# Altium PCB PCB1.PcbDoc
Units mm, origin at the board's own origin, x right, y up, seen from the top; angles counter-clockwise.
Board outline 99.95 x 99.95 mm, 4 copper layers (Top Layer, GND, PWR, Bottom Layer), stack 0.603 mm thick; 94 components, 50 nets, 219 pads, 0 vias.
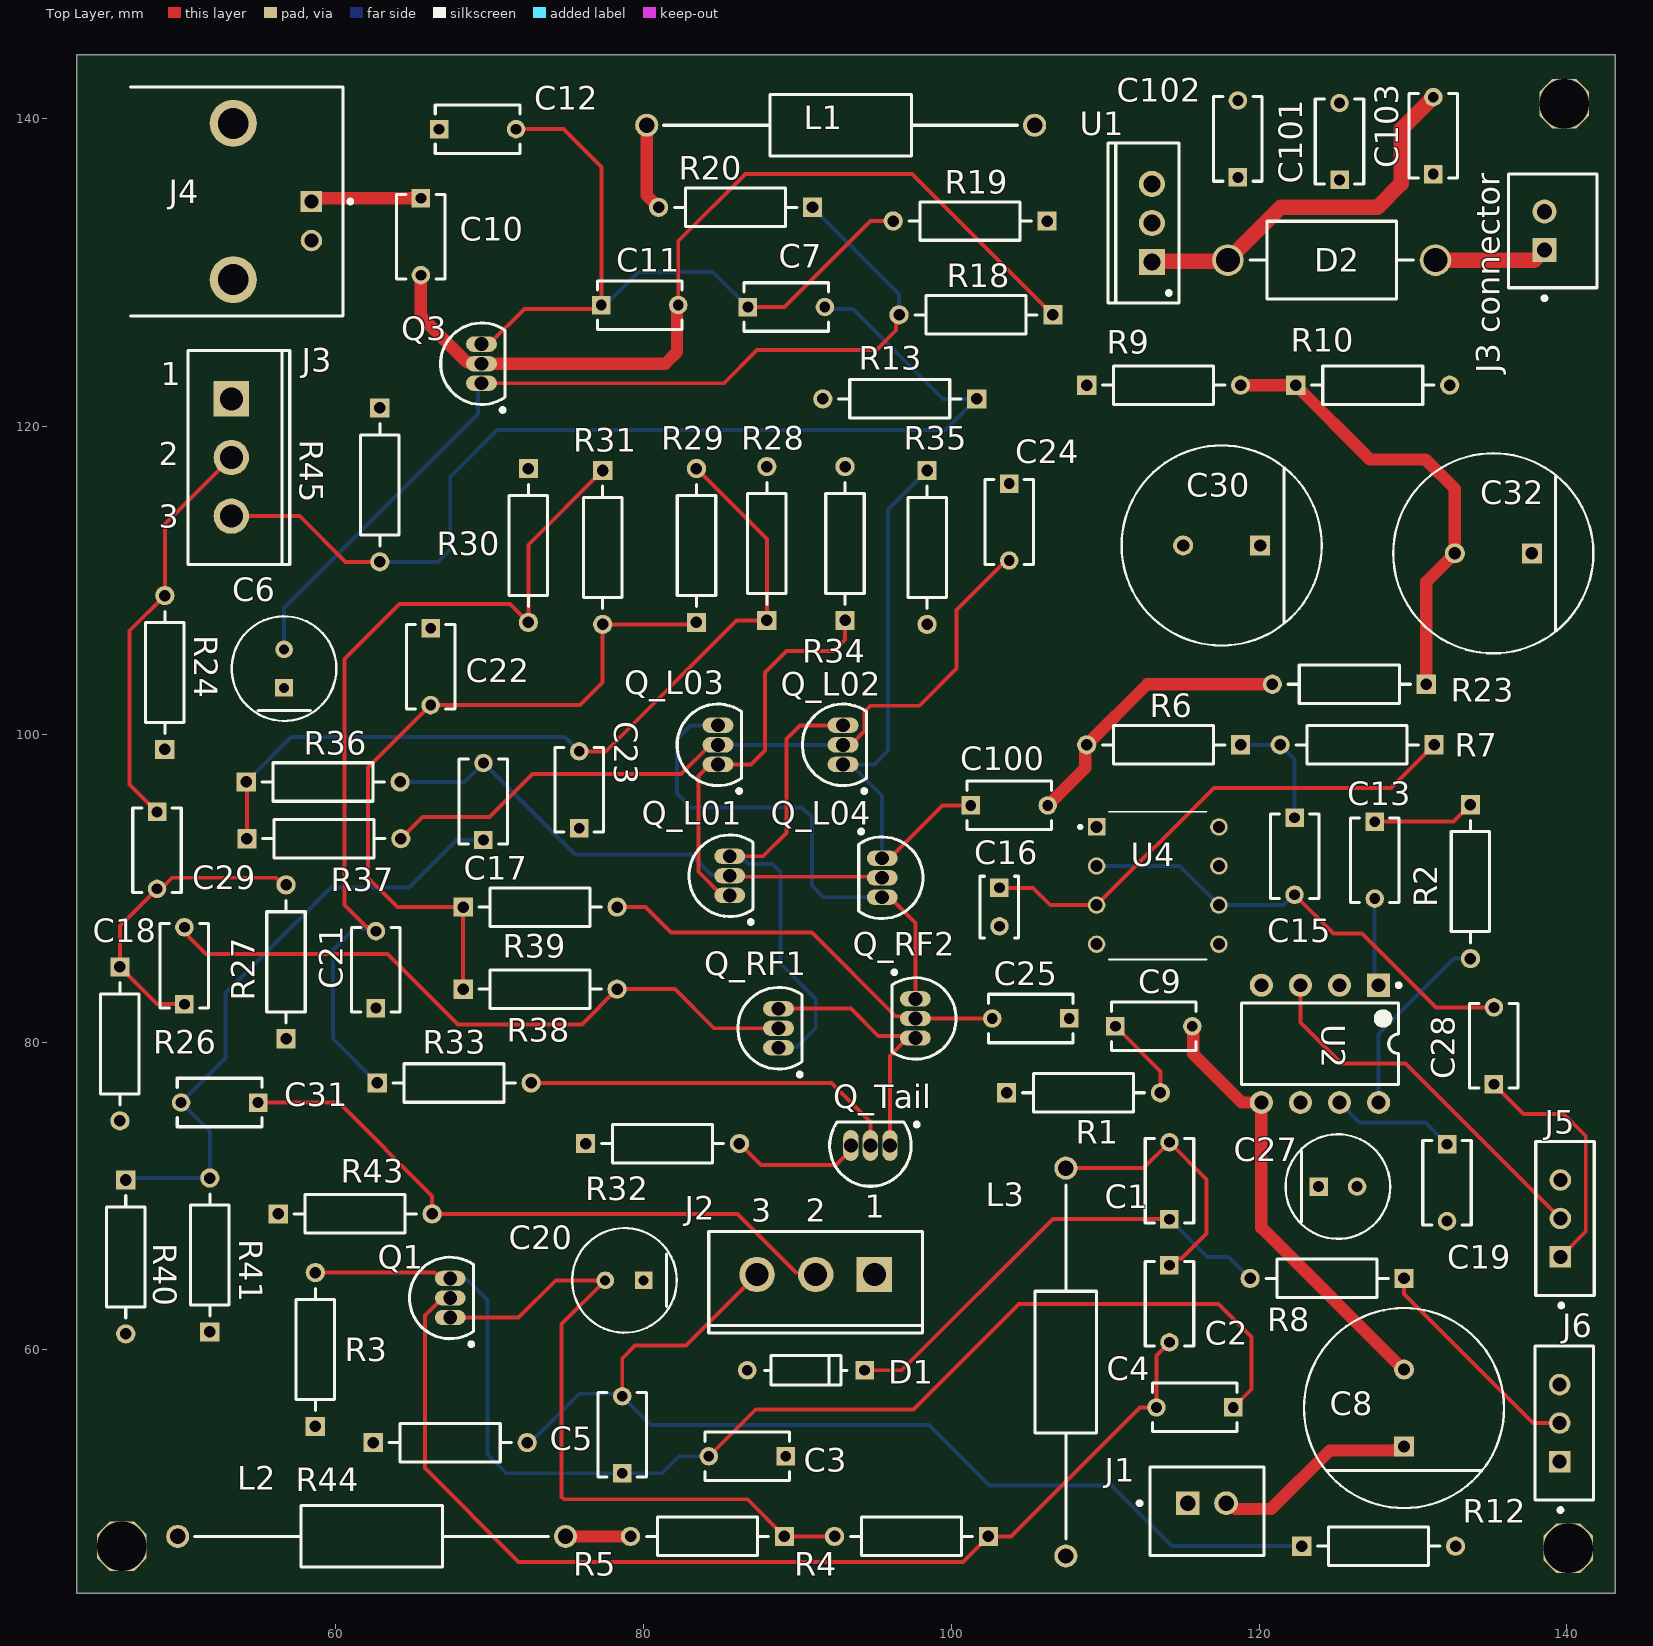
[diagram p0: Top Layer view]
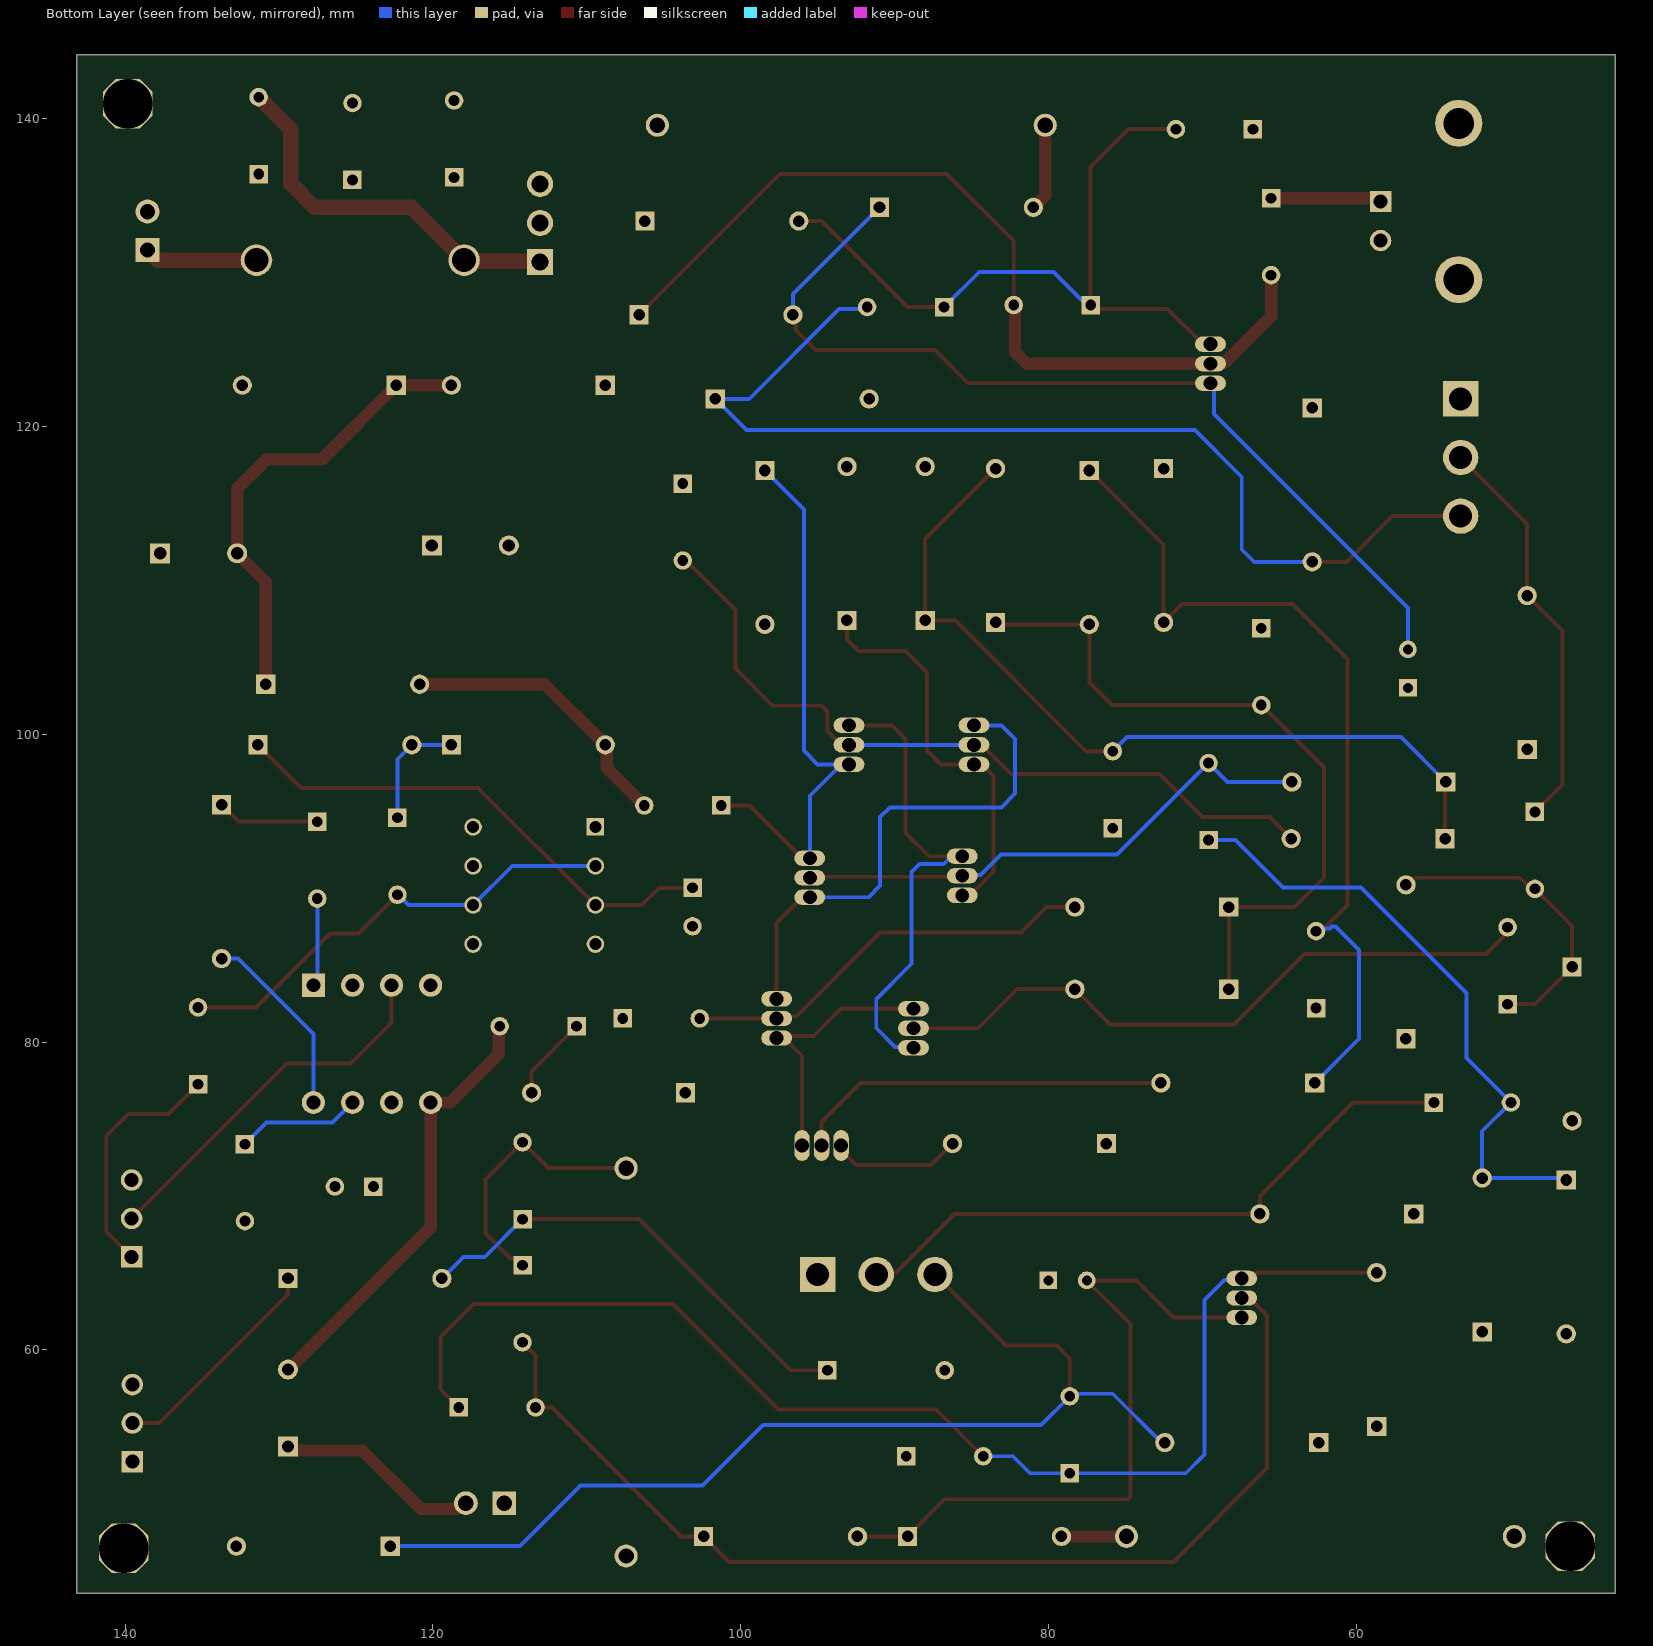
[diagram p1: Bottom Layer view, seen from below]
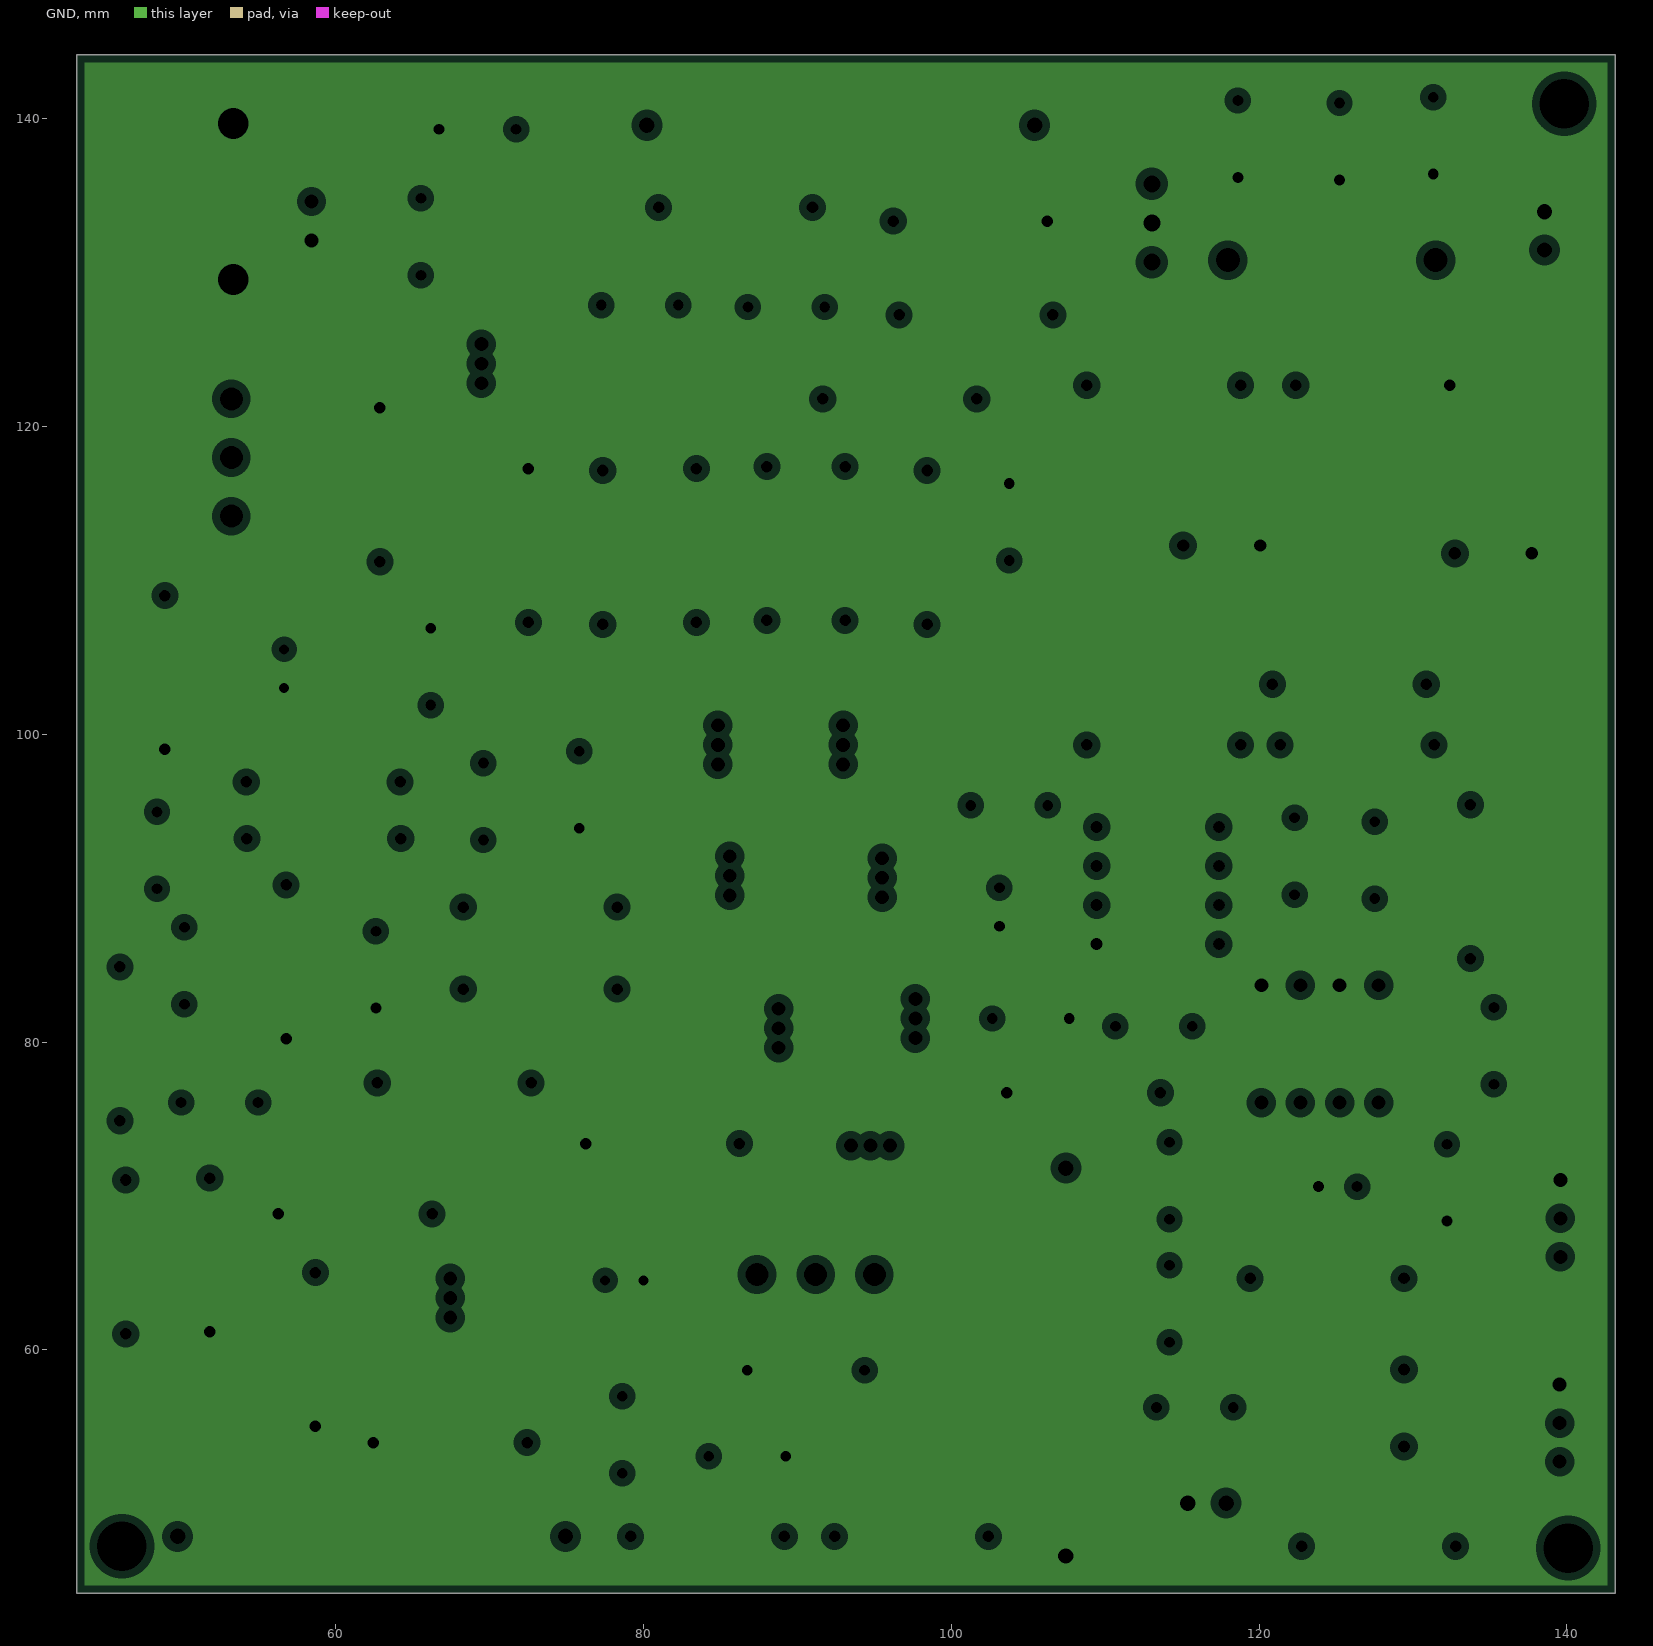
[diagram p2: GND, clearances drawn from the general rule]
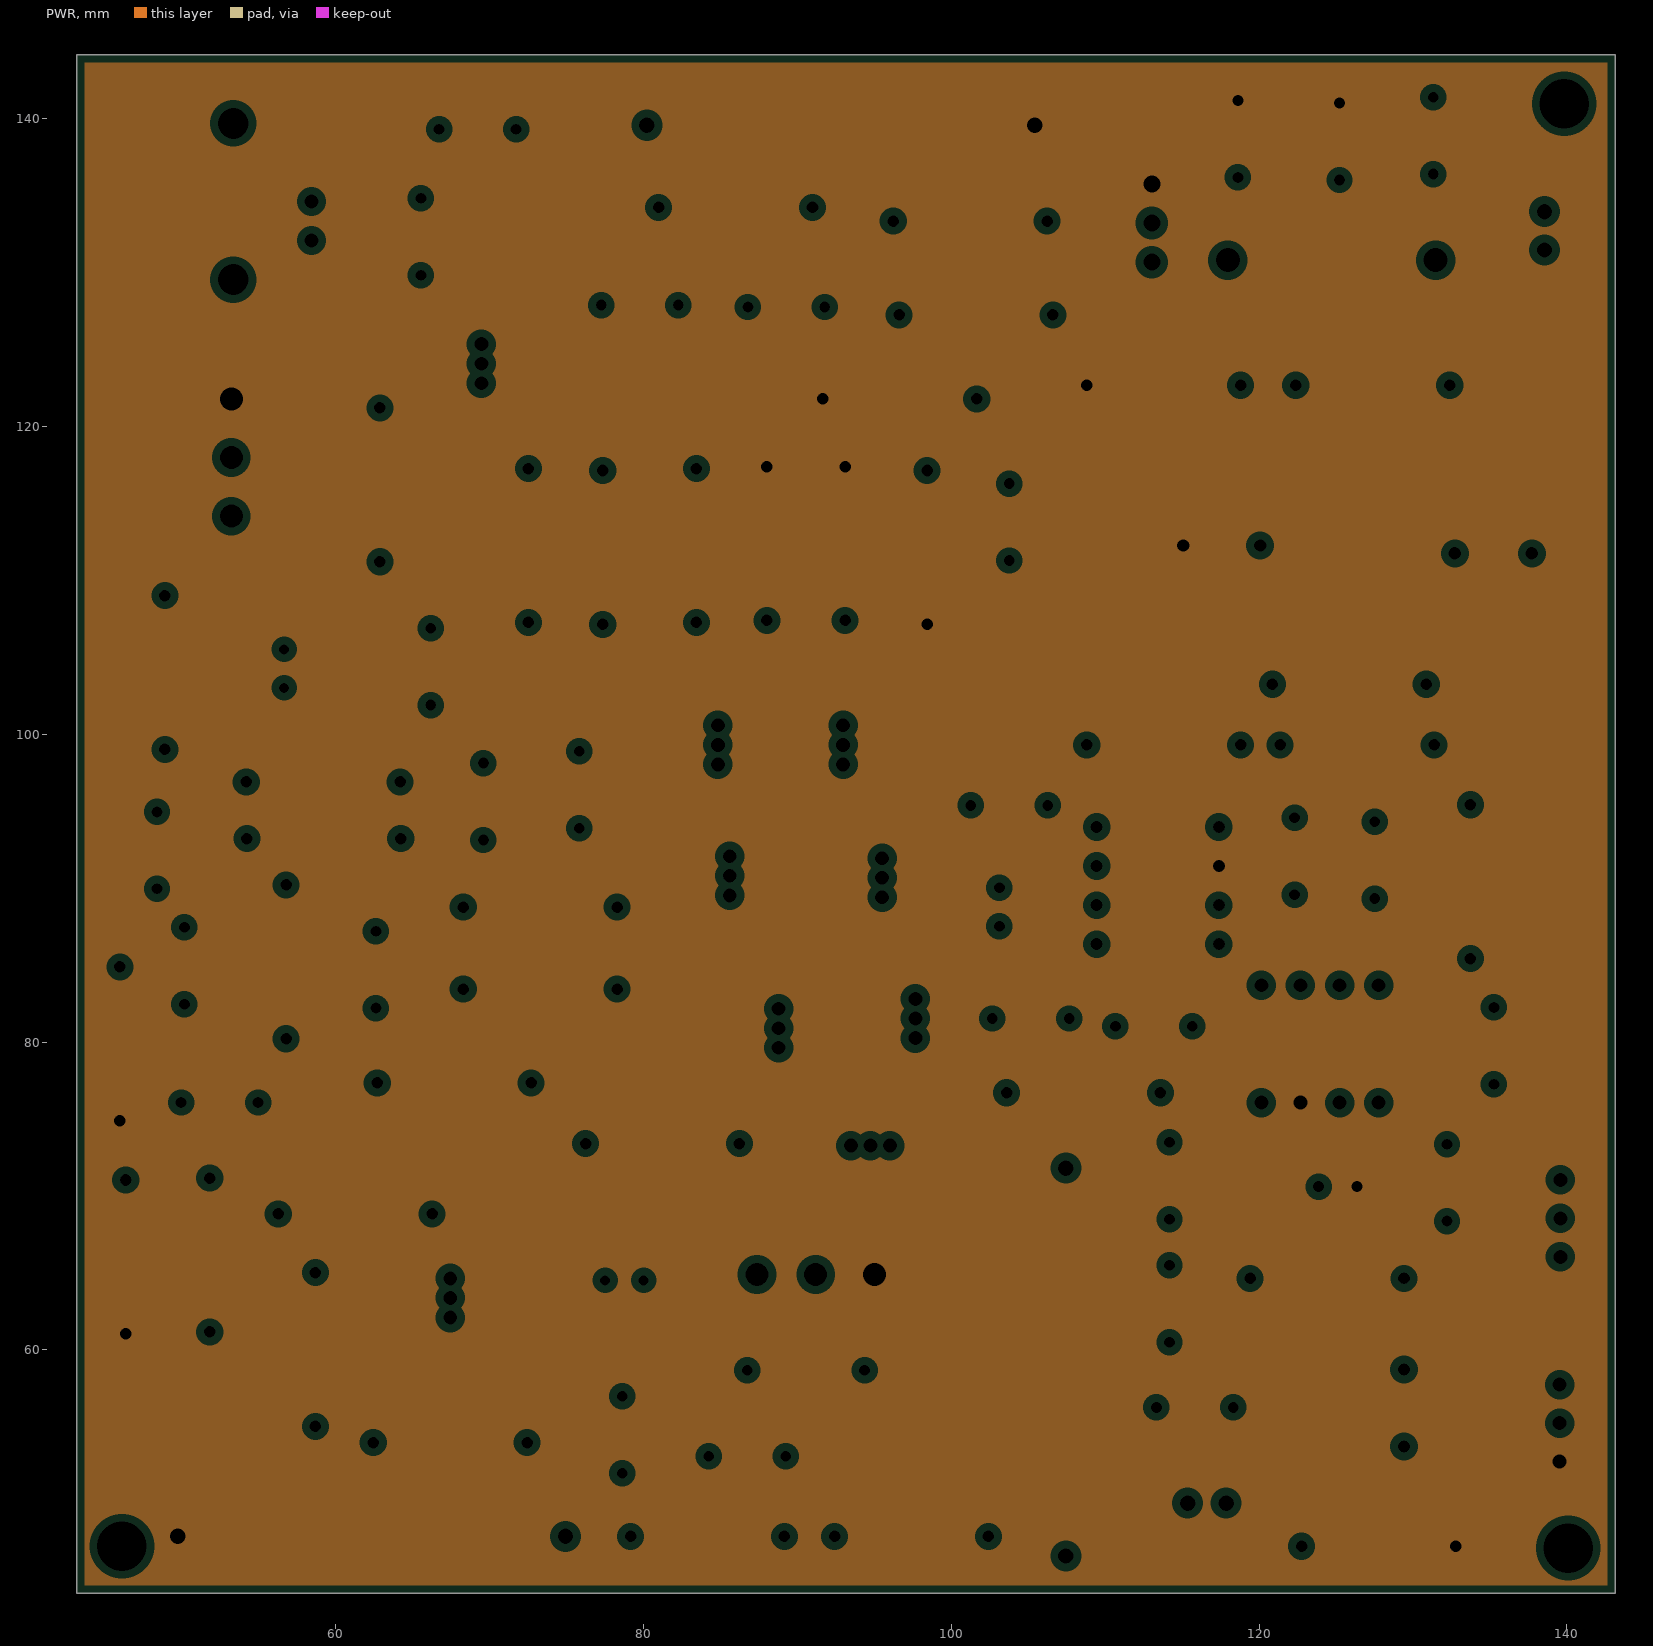
[diagram p3: PWR, clearances drawn from the general rule]
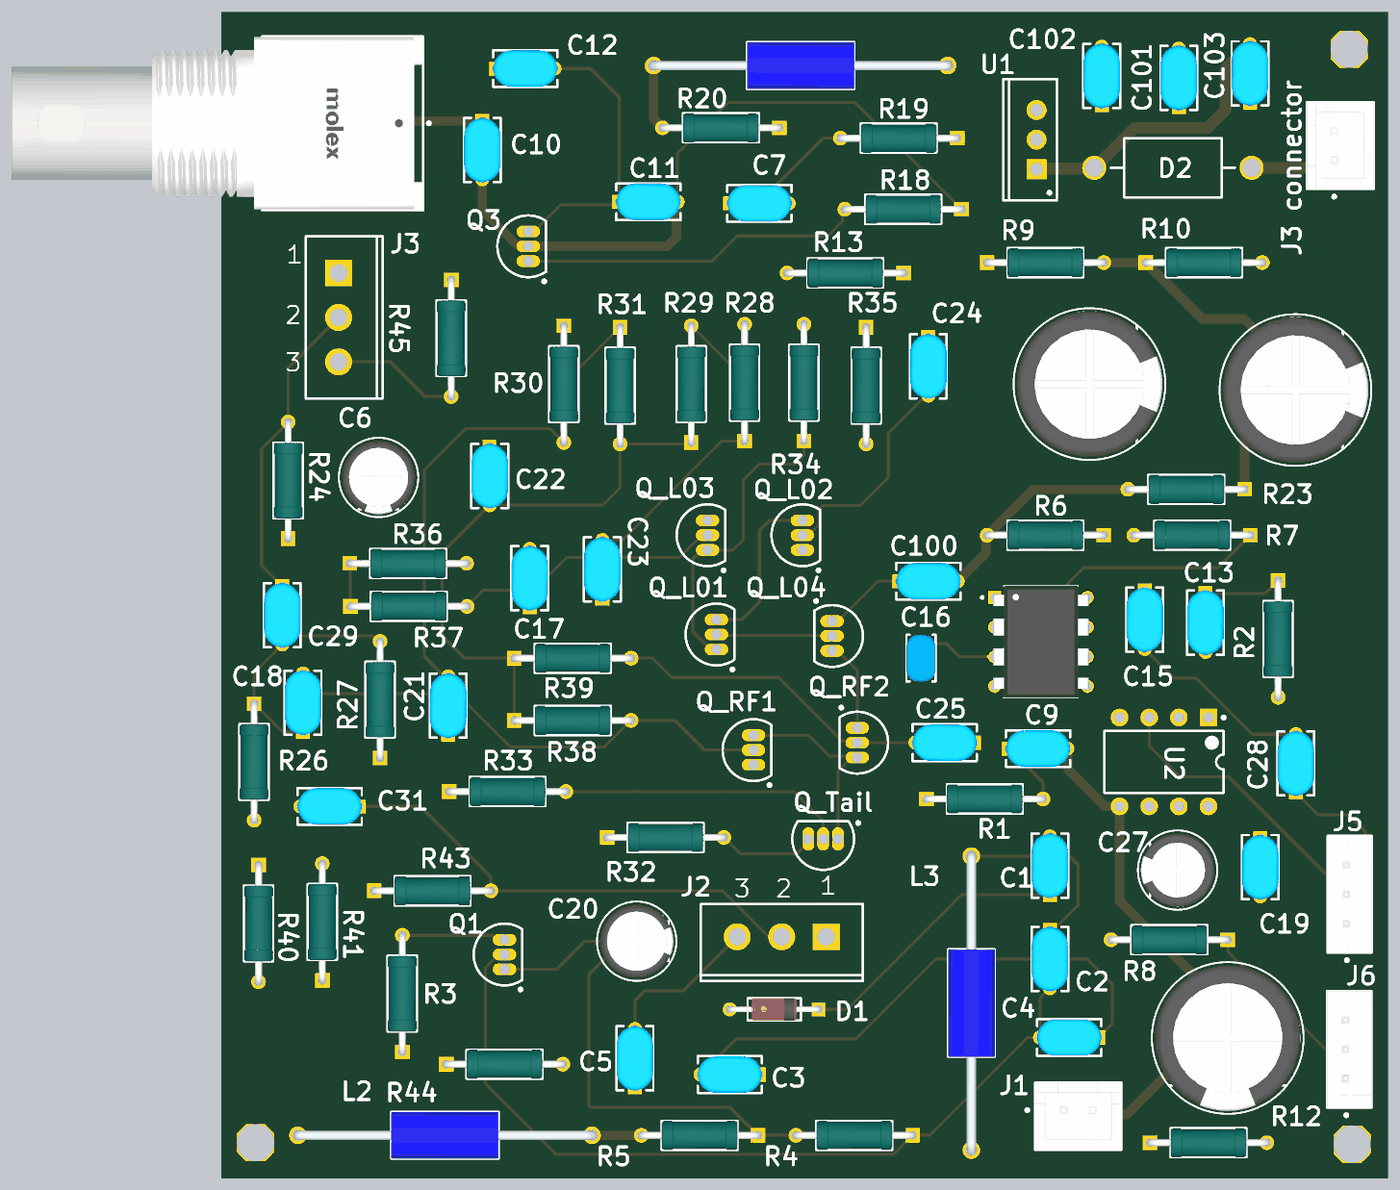
[diagram p4: 3D render of the assembled board from above, using the file's embedded part models]

## Layer stack, top to bottom
Top Solder: solder mask 0.0102, Solder Resist, Dk 3.5
Top Layer: signal copper 0.0356
Dielectric 2: prepreg 0.0711, PP-006, Dk 4.1
GND: plane copper 0.035, net GND
Dielectric 1: dielectric 0.32, FR-4, Dk 4.8
PWR: plane copper 0.035, net +9V
Dielectric 3: prepreg 0.0711, PP-006, Dk 4.1
Bottom Layer: signal copper 0.0356
Bottom Solder: solder mask 0.0102, Solder Resist, Dk 3.5

## Board outline
43.18,44.196 43.18,144.145 143.129,144.145 143.129,44.196

## Design rules (kind name [scope] priority, off if disabled: settings)
Clearance [All] p1: gap=0.254 ignorepadtopadclearanceinfootprint=FALSE
HoleSize [All] p1: absolutevalues=TRUE maxlimit=3.7 minlimit=0.025 maxpercent=80.000 minpercent=20.000
PlaneClearance [All] p1: clearance=0.508
PlaneConnect [All] p1: planeconnectstyle=Relief reliefexpansion=0.508 reliefentries=4 reliefconductorwidth=0.5 reliefairgap=0.254
PolygonConnect [All] p1: connectstyle=Relief reliefconductorwidth=0.254 reliefentries=4 polygonreliefangle="90 Angle" airgapwidth=0.254
RoutingVias [All] p1: holewidth=0.711 width=1.27 viastyle="Through Hole" minholewidth=0.711 minwidth=1.27 maxholewidth=0.711 maxwidth=1.27
SolderMaskExpansion [All] p1: expansion=0 istentingtop=FALSE
SupplyNets "Schematic Supply Nets_2" [InNet('+12')] p1: voltage=0.000
SupplyNets "Schematic Supply Nets" [InNet('GND')] p2: voltage=0.000
Width [All] p1: maxlimit=1.5 minlimit=0.254 preferedwidth=0.254 minimp=50.000000 maximp=50.000000 favimp=50.000000
27 further rules are at their usual default settings.

## Classes and differential pairs
component class Mixer: C17 C18 C21 C22 C23 C24 C25 C29 C30 C31 J2 J3 Q_L01 Q_L02 Q_L03 Q_L04 Q_RF1 Q_RF2 Q_Tail R12 R13 R24 R26 R27 R28 R29 R30 R31 R32 R33 R34 R35 R36 R37 R38 R39 R40 R41 R43 R44 R45
component class BFO_metal_detector: C1 C2 C3 C4 C5 C6 C7 C8 C9 C10 C11 C12 C13 C15 C16 C19 C20 C27 C28 C32 C100 C101 C102 C103 D1 D2 J1 "J3 connector" J4 J5 J6 L1 L2 L3 Q1 Q3 R1 R2 R3 R4 R5 R6 R7 R8 R9 R10 R18 R19 R20 R23 U1 U2 U4 U7

## Components (designator, comment, footprint, x,y, rotation, side; value= is the part's Value field where it differs from the comment)
C1 "Cap" FP-RDE2M1-MFG 114.173,70.993 r90 top value=100nF
C2 "Cap" FP-RDE2M1-MFG 114.173,62.992 r270 top value=100nF
C3 "Cap" FP-RDE2M1-MFG 86.741,53.086 r180 top value=22nF
C4 "Cap" FP-RDE2M1-MFG 115.824,56.261 r180 top value=22nF
C5 "Cap" FP-RDE2M1-MFG 78.613,54.483 r90 top value=10nF
C6 "4.7 uF" FP-UVK2D0R1MED1TD-MFG 56.642,104.267 r90 top
C7 "Cap" FP-RDE2M1-MFG 89.281,127.762 r0 top value=10nF
C8 "220 uF" FP-RAD-TH-D_12_5_0_5-L_25-MFG 129.413,56.221 r90 top
C9 "Cap" FP-RDE2M1-MFG 113.157,81.026 r0 top value=47nF
C10 "Cap" FP-RDE2M1-MFG 65.532,132.334 r270 top value=100nF
C11 "Cap" FP-RDE2M1-MFG 79.756,127.889 r0 top value=22nF
C12 "Cap" FP-RDE2M1-MFG 69.215,139.319 r0 top value=22nF
C13 "Cap" FP-RDE2M1-MFG 127.508,91.821 r270 top value=10uF
C15 "Cap" FP-RDE2M1-MFG 122.301,92.075 r270 top value="8.2 nF"
C16 "3.9 nF" FP-RCE1A2-MFG 103.124,88.773 r270 top
C17 "Cap" FP-RDE2M1-MFG 69.596,95.631 r90 top value=10nF
C18 "Cap" FP-RDE2M1-MFG 50.165,84.963 r90 top value=10nF
C19 "Cap" FP-RDE2M1-MFG 132.207,70.866 r270 top value=10uF
C20 "4.7 uF" FP-UVK2D0R1MED1TD-MFG 78.76,64.516 r180 top
C21 "Cap" FP-RDE2M1-MFG 62.611,84.709 r90 top value=10uF
C22 "Cap" FP-RDE2M1-MFG 66.167,104.394 r270 top value=10uF
C23 "Cap" FP-RDE2M1-MFG 75.819,96.393 r90 top value=10uF
C24 "Cap" FP-RDE2M1-MFG 103.759,113.792 r270 top value=100nF
C25 "Cap" FP-RDE2M1-MFG 105.156,81.534 r180 top value=100nF
C27 "100 uF" FP-RAD-TH-D_6_3_0_5-L_11-MFG 125.115,70.612 r0 top
C28 "Cap" FP-RDE2M1-MFG 135.255,79.756 r90 top value=10uF
C29 "Cap" FP-RDE2M1-MFG 48.387,92.456 r270 top value=100nF
C30 "220uF" FP-RAD-TH-D_12_5_0_5-L_25-MFG 117.562,112.268 r180 top
C31 "Cap" FP-RDE2M1-MFG 52.451,76.073 r180 top value=100nF
C32 "220 uF" FP-RAD-TH-D_12_5_0_5-L_25-MFG 135.215,111.76 r180 top
C100 "Cap" FP-RDE2M1-MFG 103.759,95.377 r0 top value=10nF
C101 "Cap" FP-RDE2M1-MFG 125.222,138.517 r90 top value=100nF
C102 "Cap" FP-RDE2M1-MFG 118.618,138.684 r90 top value=100nF
C103 "Cap" FP-RDE2M1-MFG 131.318,138.898 r90 top value=0.33uF
D1 "1N4148" FP-017AG-MFG 90.548,58.674 r180 top
D2 "1N5400" ONSC-AXIAL_LEAD-2-267-05_V 124.714,130.81 r0 top
J1 "B2B-XH-A(LF)(SN)" FP-B2B-XH-A_LF_SN-MFG 116.606,49.513 r0 top
J2 "J310" TO-254-AA 91.186,64.897 r180 top
J3 "J310" TO-254-AA 53.213,117.983 r270 top
"J3 connector" "B2B-XH-A(LF)(SN)" FP-B2B-XH-A_LF_SN-MFG 139.065,132.715 r90 top
J4 "73137-5003" FP-73137-5003-MFG 42.81,134.62 r270 top
J5 "POT_AUD" FP-B3B-EH_LF_SN-MFG 139.873,68.54 r90 top
J6 "POT_REF" FP-B3B-EH_LF_SN-MFG 139.827,55.245 r90 top
L1 "4.7mH" INDAD2520W80L920D400 80.21,139.573 r0 top
L2 "4.7mH" INDAD2520W80L920D400 74.93,47.879 r180 top
L3 "100 uH" INDAD2520W80L920D400 107.442,46.609 r90 top
Q1 "2N2222" TO-226-AA 67.437,63.373 r0 top
Q3 "2N2222" TO-226-AA 69.469,124.079 r0 top
Q_L01 "2N2222" TO-226-AA 85.598,90.805 r0 top
Q_L02 "2N2222" TO-226-AA 92.964,99.314 r0 top
Q_L03 "2N2222" TO-226-AA 84.836,99.314 r0 top
Q_L04 "2N2222" TO-226-AA 95.504,90.678 r180 top
Q_RF1 "2N2222" TO-226-AA 88.773,80.899 r0 top
Q_RF2 "2N2222" TO-226-AA 97.663,81.534 r180 top
Q_Tail "BC547C" TO-226-AA 94.742,73.279 r90 top
R1 "Res2" FP-MRS25-MFG 108.585,76.708 r0 top value=10
R2 "Res2" FP-MRS25-MFG 133.731,90.424 r270 top value=1.2K
R3 "Res2" FP-MRS25-MFG 58.674,60.024 r90 top value=22K
R4 "Res2" FP-MRS25-MFG 97.409,47.879 r180 top value=22K
R5 "Res2" FP-MRS25-MFG 84.154,47.879 r180 top value=1K
R6 "Res2" FP-MRS25-MFG 113.792,99.314 r180 top value=1.8K
R7 "Res2" FP-MRS25-MFG 126.365,99.314 r180 top value=1.8K
R8 "15k" FP-MRS25-MFG 124.413,64.643 r180 top
R9 "Res2" FP-MRS25-MFG 113.792,122.682 r0 top value=18K
R10 "Res2" FP-MRS25-MFG 127.381,122.682 r0 top value=18K
R12 "Res2" FP-MRS25-MFG 127.762,47.244 r0 top value=1Mega
R13 "Res2" FP-MRS25-MFG 96.647,121.793 r180 top value=1Mega
R18 "Res2" FP-MRS25-MFG 101.6,127.254 r180 top value=22K
R19 "Res2" FP-MRS25-MFG 101.219,133.35 r180 top value=22K
R20 "Res2" FP-MRS25-MFG 85.979,134.239 r180 top value=1K
R23 "Res2" FP-MRS25-MFG 125.857,103.251 r180 top value=100K
R24 "Res2" FP-MRS25-MFG 48.895,104.013 r90 top value=10K
R26 "Res2" FP-MRS25-MFG 45.974,79.883 r270 top value=1Mega
R27 "Res2" FP-MRS25-MFG 56.769,85.217 r90 top value=1Mega
R28 "Res2" FP-MRS25-MFG 88.011,112.395 r90 top value=3.3K
R29 "Res2" FP-MRS25-MFG 83.439,112.268 r90 top value=2.2K
R30 "Res2" FP-MRS25-MFG 72.517,112.268 r270 top value=1.5K
R31 "Res2" FP-MRS25-MFG 77.343,112.141 r270 top value=2.2K
R32 "Res2" FP-MRS25-MFG 81.233,73.406 r0 top value=390
R33 "Res2" FP-MRS25-MFG 67.691,77.343 r0 top value=10K
R34 "Res2" FP-MRS25-MFG 93.091,112.395 r90 top value=2.2K
R35 "Res2" FP-MRS25-MFG 98.425,112.141 r270 top value=2.2K
R36 "Res2" FP-MRS25-MFG 59.182,96.901 r0 top value=10K
R37 "Res2" FP-MRS25-MFG 59.229,93.218 r0 top value=10K
R38 "Res2" FP-MRS25-MFG 73.279,83.439 r0 top value=10K
R39 "Res2" FP-MRS25-MFG 73.279,88.773 r0 top value=10K
R40 "Res2" FP-MRS25-MFG 46.355,66.04 r270 top value=1Mega
R41 "Res2" FP-MRS25-MFG 51.816,66.167 r90 top value=1Mega
R43 "Res2" FP-MRS25-MFG 61.261,68.834 r0 top value=10k
R44 "Res2" FP-MRS25-MFG 67.437,53.975 r0 top value=1Mega
R45 "Res2" FP-MRS25-MFG 62.865,116.205 r270 top value=1Mega
U1 "L7809CV" TO220 113.03,133.223 r90 top
U2 "LM386N-4/NOPB" P0008A 123.952,79.883 r270 top
U4 "TL071CP" DIP794W45P254L959H508Q8 113.411,90.17 r0 top

## Footprints (in the part's own frame and the unit in brackets; to place one, negate y for a bottom-side part, rotate by r counter-clockwise, add the part's x,y. Pads: shape width x height; smd on the part's side, far side on the other; paste and mask are expansions set on the pad)
DIP794W45P254L959H508Q8 [mm]
  rect 1.13x1.13 / inner round 1.13 / far side rect 1.13x1.13 hole 0.78 mask+0.102: 1(-3.97,3.81)
  round 1.13 hole 0.78 mask+0.102: 2(-3.97,1.27) 3(-3.97,-1.27) 4(-3.97,-3.81) 5(3.97,-3.81) 6(3.97,-1.27) 7(3.97,1.27) 8(3.97,3.81)
  silkscreen extent -5.13,-4.79 3.17,4.79, body extent -4.1,-4.79 4.1,4.79, height 5.08
FP-017AG-MFG [mm]
  rect 1.2x1.2 hole 0.7 paste-2539.97 mask+0: 1(-3.813,0)
  round 1.2 hole 0.7 paste-2539.97 mask+0: 2(3.813,0)
  silkscreen extent -2.68,-0.95 2.68,0.95, body extent -4.51,-1.05 4.51,1.05, height 0.25
FP-73137-5003-MFG [mm]
  rect 1.39x1.39 hole 0.89 paste-2539.97 mask+0: 1(0,15.61)
  round 1.39 hole 0.89 paste-2539.97 mask+0: 2(2.54,15.61)
  round 3.06 hole 2.01 paste-2539.97 mask+0: 3(-5.08,10.53) 4(5.08,10.53)
  silkscreen extent -7.44,3.84 7.44,18.26, body extent -7.54,-17.75 7.54,17.75, height 0.25
FP-B2B-XH-A_LF_SN-MFG [mm]
  rect 1.55x1.55 hole 1 paste-2539.97 mask+0: 1(-1.25,0.525)
  round 1.55 hole 1 paste-2539.97 mask+0: 2(1.25,0.525)
  silkscreen extent -4.5,-2.88 3.7,2.88, body extent -3.8,-2.98 3.8,2.98, height 0.25
FP-B3B-EH_LF_SN-MFG [mm]
  rect 1.4x1.4 hole 0.9 paste-2539.97 mask+0: 1(-2.5,0.3)
  round 1.4 hole 0.9 paste-2539.97 mask+0: 2(0,0.3) 3(2.5,0.3)
  silkscreen extent -5.77,-1.9 5,1.9, body extent -5.1,-2 5.1,2, height 0.25
FP-MRS25-MFG [mm]
  rect 1.25x1.25 hole 0.75 paste-2539.97 mask+0: 1(-5,0)
  round 1.25 hole 0.75 paste-2539.97 mask+0: 2(5,0)
  silkscreen extent -3.98,-1.25 3.98,1.25, body extent -5.72,-1.35 5.72,1.35, height 0.25
FP-RAD-TH-D_6_3_0_5-L_11-MFG [mm]
  rect 1.2x1.2 hole 0.7 paste-2539.97 mask+0: 1(-1.25,0)
  round 1.2 hole 0.7 paste-2539.97 mask+0: 2(1.25,0)
  silkscreen extent -3.4,-3.4 3.4,3.4, body extent -3.5,-3.5 3.5,3.5, height 0.25
FP-RAD-TH-D_12_5_0_5-L_25-MFG [mm]
  rect 1.3x1.3 hole 0.8 paste-2539.97 mask+0: 1(-2.5,0)
  round 1.3 hole 0.8 paste-2539.97 mask+0: 2(2.5,0)
  silkscreen extent -6.5,-6.5 6.5,6.5, body extent -6.6,-6.6 6.6,6.6, height 0.25
FP-RCE1A2-MFG [mm]
  rect 1.2x1.2 hole 0.7 paste-2539.97 mask+0: 1(-1.25,0)
  round 1.2 hole 0.7 paste-2539.97 mask+0: 2(1.25,0)
  silkscreen extent -2,-1.25 2,1.25, body extent -2.1,-1.35 2.1,1.35, height 0.25
FP-RDE2M1-MFG [mm]
  rect 1.2x1.2 hole 0.7 paste-2539.97 mask+0: 1(-2.5,0)
  round 1.2 hole 0.7 paste-2539.97 mask+0: 2(2.5,0)
  silkscreen extent -2.75,-1.58 2.75,1.58, body extent -3.2,-1.68 3.2,1.68, height 0.25
FP-UVK2D0R1MED1TD-MFG [mm]
  rect 1.15x1.15 hole 0.65 paste-2539.97 mask+0: 1(-1.25,0)
  round 1.15 hole 0.65 paste-2539.97 mask+0: 2(1.25,0)
  silkscreen extent -3.4,-3.4 3.4,3.4, body extent -3.5,-3.5 3.5,3.5, height 0.25
INDAD2520W80L920D400 [mm]
  round 1.5 hole 1: 1(0,0) 2(25.2,0)
  silkscreen extent 1.1,-2 24.1,2, body extent -0.4,-2 25.6,2, height 3.99
ONSC-AXIAL_LEAD-2-267-05_V [mm] "AXIAL, 2-Leads, Diameter 5.05mm"
  round 2.05 hole 1.55: 1(-6.745,0) 2(6.745,0)
  silkscreen extent -5.32,-2.52 5.32,2.52
P0008A [mm] "DIP, 8-Leads, Body 10.15x6.6mm, Pitch 2.54mm"
  rect 1.5x1.5 hole 0.9: 1(-3.81,3.81)
  round 1.5 hole 0.9: 2(-3.81,1.27) 3(-3.81,-1.27) 4(-3.81,-3.81) 5(3.81,-3.81) 6(3.81,-1.27) 7(3.81,1.27) 8(3.81,3.81)
  silkscreen extent -3.93,-5.1 2.65,5.24, body extent -3.95,-5.07 3.95,5.07, height 5.08
TO220 [mm] "TO, Thru-Hole, Vertical, Heatsink Mounted; 3 In-Line Leads; Pitch 2.54 mm"
  rect 1.7x1.7 hole 1.1: 1(-2.54,0)
  round 1.7 hole 1.1: 2(0,0) 3(2.54,0)
  silkscreen extent -5.2,-1.75 5.2,2.85, body extent -5.25,-1.8 5.25,2.9, height 19.7
TO-226-AA [mm] "TO, Flat Index; 3 In-Line, Axial Leads; Body Dia. 4.8mm; Leads 0.55 x 0.51 mm (max)"
  oval 2x1 hole 0.9: 1(0,-1.27) 2(0,0) 3(0,1.27)
  silkscreen extent -2.65,-3.13 1.52,2.65, body extent -2.65,-2.66 1.52,2.66, height 5.33
TO-254-AA [mm] "TO, Thru-Hole, Vertical, Heatsink Mounted; 3 In-Line Leads; Pitch 3.81 mm"
  rect 2.3x2.3 hole 1.5: 1(-3.81,0)
  round 2.3 hole 1.5: 2(0,0) 3(3.81,0)
  silkscreen extent -6.95,-2.8 6.95,3.8

## Part data
C1 C2 C3 C4 C5 C7 C9 C10 C11 C12 C13 C15 C17 C18 C19 C21 C22 C23 C24 C25 C28 C29 C31 C100 C101 C102 C103: "Capacitor", LatestRevisionDate=17-Jul-2002, LatestRevisionNote="Re-released for DXP Platform.", PackageDescription="Radial Cap, Thru-Hole; 2 Leads; 0.3 in Pin Spacing", PackageReference=RAD-0.3, Published=8-Jun-2000, Publisher="Altium Limited"
C6 C20: library part CMP-00267-12791902-1, "UVK2D0R1MED1TD Radial Can ALUMINUM ELECTROLYTIC CAPACITOR UVK 200V 0.1muF ±20% 0.248Dia 6.30mm", Capacitance=100nF, Case/Package=Radial, Dielectric Material=Aluminium, Leakage Current=42µA, Max Operating Temperature=85°C, Min Operating Temperature=-40°C, Ripple Current=2.1mA, Tolerance=20%, Voltage Rating=200V, Diameter=6.3mm, Dissipation Factor=20%, Height=11mm, Height - Seated (Max)=12.4968mm, Lead Pitch=2.4892mm, Life (Hours)=2000hours, Mount="Through Hole", NexarPartId=12791902, RoHS=Compliant, Voltage Rating (DC)=200V
C8 C30 C32: library part CMP-05427-000330-1, "Aluminum Electrolytic Capacitors (Radial Lead Type) 220uF ±20% 100V", RoHS Compliant=Yes
C16: library part CMP-06035-043805-1, "Cap Ceramic 47nF 100V X7R ±10% Radial 2.5mm +125°C Automotive Ammo Pack", Capacitance=47nF, Case/Package=Radial, Dielectric=X7R, Max Operating Temperature=125°C, Min Operating Temperature=-55°C, Package Quantity=2000, Ratings=AEC-Q200, Resistor Type=Ceramic, Tolerance=10%, Voltage Rating=100V, Height=3.5mm, Height - Seated (Max)=0.138inch, Lead Diameter=0.5mm, Lead Pitch=0.098inch, Lead/Base Style=Straight, Length=0.157inch, Mount="Through Hole", Packaging="Tape and Reel", Termination=Radial, Voltage Rating (DC)=100V, Width=0.098inch
C27: library part CMP-05427-000141-1, "Aluminum Electrolytic Capacitors (Radial Lead Type) AEC-Q200 Qualified 100uF ±20% 25V", Capacitance=100uF, Case/Package=Radial, Max Operating Temperature=105°C, Min Operating Temperature=-55°C, Package Quantity=2000, Ripple Current=130mA, Tolerance=20%, Voltage Rating=25V, Construction=RADIAL, Contact Plating=Tin, Diameter=6.3mm, Height=11.2mm, Height - Seated (Max)=0.48inch, Lead Diameter=0.5mm, Lead Pitch=2.5mm, Lead/Base Style=Straight, Length=11.2mm, Life (Hours)=1000Hour, Mount="Through Hole", Packaging="Ammo Pack", Radiation Hardening=No, RoHS Compliant=Yes, Series=NHG, Termination=Radial, Voltage Rating (DC)=25V, Width=6.3mm
D1: library part CMP-07163-000046-1, "DIODE GEN PURP 100V 200MA DO35", Average Rectified Current=200mA, Capacitance=4pF, Case/Package=DO-35, Current=4A, Forward Current=300mA, Forward Voltage=1V, Max Forward Surge Current (Ifsm)=1A, Max Operating Temperature=175°C, Max Power Dissipation=500mW, Max Repetitive Reverse Voltage (Vrrm)=100V, Max Reverse Current=5uA, Min Operating Temperature=-65°C, Package Quantity=2000, Contact Plating=Tin, Current Rating=200mA, Diameter=1.91mm, Element Configuration=Single, Height=4.56mm, Lead Free="Lead Free", Length=4.56mm, Max Reverse Voltage (DC)=100V, Max Surge Current=4A, Mount="Through Hole", Number of Pins=2, Output Current=200mA, Outside Diameter=1.85mm, Packaging=Bulk, Peak Non-Repetitive Surge Current=4A, Polarity=Standard, Power Dissipation=500mW, Radiation Hardening=No, REACH SVHC="No SVHC", Recovery Time=4ns, Reverse Recovery Time=4ns, Reverse Voltage=100V, Series=-, Voltage=100V, Voltage Rating (DC)=100V, Weight=0.01lb, Width=1.91mm
D2: library part CMP-0902-00082-1, "Standard Recovery Rectifier, 2-Pin Axial_Lead, Pb-Free, Bulk Box", Manufacturer="On Semiconductor", ComponentLink1Description="Manufacturer URL", ComponentLink1URL=http://www.onsemi.com/, ComponentLink2Description=Datasheet, ComponentLink2URL=http://www.onsemi.com/pub_link/Collateral/1N5400-D.PDF, ComponentLink3Description="Package Specification", ComponentLink3URL=http://www.onsemi.com/pub_link/Collateral/267-05.PDF, DatasheetVersion="Rev. 10", IFSM Max (A)=200, IO(rec) Max (A)=3, Mounting Technology="Through Hole", PackageDescription="2-Pin, Axial Lead, Diameter 5.05 mm", PackageReference=AXIAL_LEAD-2-267-05, PackageVersion="Rev. G, 06/2000", Packing="Bulk Box", PartNumber=1N5400, RoHS=TRUE, Type="Standard Recovery", VRRM Max (V)=50
J1 "J3 connector": library part CMP-2000-05888-3, "CONN HEADER VERT 2POS 2.5MM", Color=Natural, Contact Resistance=20mR, Current Rating=3A, Housing Color=White, Insulation Resistance=1GR, Max Operating Temperature=85°C, Max Voltage Rating (AC)=250V, Min Operating Temperature=-25°C, Connector Type="Male Pin", Contact Material=Brass, Contact Plating=Tin, Contact Type="Male Pin", Depth=5.75mm, Fastening Type=Detent, Housing Material=Polyamide, Lead Free="Lead Free", Lead Pitch=2.5mm, Length=7.4mm, Max Current Rating=3A, Max Voltage Rating (DC)=250V, Mount="Through Hole", Number of Contacts=2, Number of Positions=2, Number of Rows=1, Orientation=Straight, Packaging=Bulk, Pitch=2.5mm, REACH SVHC="No SVHC", Series=XH, Termination=Solder, Voltage Rating=250V, Voltage Rating (AC)=250V, Wire/Cable Gauge=22AWG
J2 J3: library part JFET-N, "N-Channel JFET", Code_JEDEC=TO-254-AA, LatestRevisionDate=17-Jul-2002, LatestRevisionNote="Re-released for DXP Platform.", PackageReference=TO-254-AA, Published=8-Jun-2000, Publisher="Altium Limited"
J4: library part CMP-00257-00776508-1, "73137-5003 Connector BNC Female 0Hz To 2GHz 50 Ohm Solder Right Angle Through Hole Gold Tray", Dielectric Material=Polypropylene, Frequency=2GHz, Manufacturer Lifecycle Status=ACTIVE, Max Operating Temperature=70°C, Min Operating Temperature=-20°C, Voltage Rating=500V, Body Material="PBT, Polybutylene", Body Plating=Nickel, Connector Type=PCB, Contact Material="Bronze, Gold, Nickel, Tin", Contact Plating=Gold, Country of Origin=US, Depth=14.76mm, Gender=Female, Halogen Free="Low Halogen", Height=13.2mm, Impedance=50Ω, Insulation Material=Polyester, Lead Free="Lead Free", Length=35.18mm, Lifecycle Status=Production, Mount="Through Hole", NexarPartId=776508, Number of Contacts=1, Orientation="Right Angle, Straight", Plating=Nickel, Polarity=Normal, Radiation Hardening=No, REACH SVHC="No SVHC", RoHS=Compliant, Termination=Solder
J5 J6: library part CMP-17439-000692-1, "3 Position Single Row 2.5 mm Press Fit Through Hole Shrouded Pin Header", Current Rating=3A, Voltage Rating=250V, Contact Material=Brass, Lead Free="Lead Free", Mount="Through Hole", Number of Contacts=3, Number of Positions=3, Number of Rows=1, Orientation=Straight, Pitch=2.5mm, Series=EH, Termination=Solder
L1 L2 L3: library part B78108S1153K000, "Inductor", Manufacturer_Name=TDK, Datasheet Link=https://product.tdk.com/system/files/dam/doc/product/inductor/inductor/lead/data_sheet/30/db/ind_2008/b78108_148s.pdf, Manufacturer_Part_Number=B78108S1153K000
Q1 Q3 Q_L01 Q_L02 Q_L03 Q_L04 Q_RF1 Q_RF2 Q_Tail: library part NPN, "NPN Bipolar Transistor", Code_JEDEC=TO-226-AA, LatestRevisionDate=17-Jul-2002, LatestRevisionNote="Re-released for DXP Platform.", PackageDescription="TO, Flat Index; 3 In-Line, Axial Leads; Body Dia. 4.8mm; Leads 0.55 x 0.51 mm (max)", PackageReference=TO-226-AA, Published=8-Jun-2000, Publisher="Altium Limited"
R1 R2 R3 R4 R5 R6 R7 R9 R10 R12 R13 R18 R19 R20 R23 R24 R26 R27 R28 R29 R30 R31 R32 R33 R34 R35 R36 R37 R38 R39 R40 R41 R43 R44 R45: "Resistor", LatestRevisionDate=17-Jul-2002, LatestRevisionNote="Re-released for DXP Platform.", PackageDescription="Axial Device, Thru-Hole; 2 Leads; 0.4 in Pin Spacing", PackageReference=AXIAL-0.4, Published=8-Jun-2000, Publisher="Altium Limited"
R8: library part CMP-00030-42632392-1, "MRS25000C1002FCT00 Resistor, 10 kOhm, ± 1%, 600 mW, Axial Leaded, Metal Film (Thin Film), Professional", Case/Package=Conformal, Max Operating Temperature=155°C, Max Power Dissipation=600mW, Min Operating Temperature=-55°C, Resistance=10kΩ, Temperature Coefficient=50ppm/°C, Tolerance=1%, Voltage Rating=350V, Composition="Metal Film, Thin Film", Contact Plating=Tin, Diameter=2.5mm, Lead Free="Lead Free", Lead Length=26mm, Length=6.5mm, Military Standard=Not, Mount="Through Hole", NexarPartId=42632392, Number of Pins=2, Number of Terminations=2, Power Rating=600mW, Radiation Hardening=No, REACH SVHC=Unknown, RoHS=Compliant, Schedule B="8533210090, 8533210090", Termination=Axial, Voltage Rating (DC)=350V, Width=2.5mm
U1: library part CMP-0244-00459-1, "Positive Voltage Regulator, 9V, 3-Pin TO-220", ComponentLink1Description="Manufacturer URL", ComponentLink1URL=http://www.st.com, ComponentLink2Description=Datasheet, ComponentLink2URL=http://www.st.com/internet/com/TECHNICAL_RESOURCES/TECHNICAL_LITERATURE/DATASHEET/CD00000444.pdf, ComponentLink3Description="Package Specification", ComponentLink3URL=http://www.st.com/internet/com/TECHNICAL_RESOURCES/TECHNICAL_LITERATURE/PACKAGE_INFORMATION/CD00004649.pdf, DatasheetVersion=16/11/2011, PackageDescription="TO, Thru-Hole, Vertical, Heatsink Mounted; 3 In-Line Leads; Pitch 2.54 mm", PackageReference=TO220, PackageVersion=ver3.0
U2: library part CMP-0057-00047-4, "Low Voltage Audio Power Amplifier, 8-pin MDIP, Pb-Free", Manufacturer="Texas Instruments", PackageTopMarking=NSUZXYTTE#*LM*386N-4, PowerWise=N, Code_JEDEC=MS-001-BA, ComponentLink1Description="Datasheet URL", ComponentLink1URL=http://www.ti.com/general/docs/lit/getliterature.tsp?genericPartNumber=LM386&fileType=pdf, CompType="Audio IC", PackageDescription="MDIP, .365 x .250 x .130in, 8 Lead, .100in Pitch", PackageReference=P0008A, PinCount=8, RoHS=Y
U4: "Single, 30-V, 3-MHz, high slew rate (13-V/Âµs), In to V+, JFET-input op amp", Package="PDIP-8 Texas", Check_prices=https://www.snapeda.com/parts/TL071CP/Texas+Instruments/view-part/?ref=eda, MF="Texas Instruments", MP=TL071CP, SnapEDA_Link=https://www.snapeda.com/parts/TL071CP/Texas+Instruments/view-part/?ref=snap

## Free pads (board coordinates)
  oct 3.2x3.2 hole 3.2 unplated: 2(46.101,47.244) 3(140.081,47.117) 4(139.827,140.97)

## Nets (pads, with @x,y where several pads share a name; then routed paths per layer and width w, separated by ;. In a path a pad name is that pad's centre, name@x,y a point inside that pad or via, vN(x,y) a via of type N, cw(c..) or ccw(c..) an arc to the next point about the centre after c; other vN are vias at no path point)
"+4.5 V": C32.2 R9.2 R10.1 R23.1 | length 30.2
  Top Layer w0.8: R9.2 R10.1 127.207,117.856 130.81,117.856 132.715,115.951 C32.2 130.857,109.902 R23.1
+9V: C27.2 C30.2 C101.2 C102.2 J2.1 J3.1 J6.1 L1.2 L2.2 R9.1 R12.2 R13.2 R26.2 R28.2 R34.2 R35.2 R40.2 U1.3 U2.6 U4.7 | length 0.3
  Top Layer w0.254: R13.2@91.191,121.655 R13.2@91.243,121.707 ; R13.2@91.567,121.713 R13.2
  Top Layer w0.8: L2.2 L2.2@49.757,47.906 ; R13.2@91.561,121.707 R13.2
+12: "J3 connector.1" D2.2 | length 7.4
  Top Layer w1: D2.2 137.885,130.81 138.54,131.465
gil_out: C100.1 Q_L02.1 Q_L04.1 R35.1 | length 36.7
  Top Layer w0.254: Q_L04.1 96.004,91.948 99.433,95.377 C100.1
  Bottom Layer w0.254: Q_L02.1 Q_L02.1@93.464,98.044 ; Q_L04.1 95.504,96.004 Q_L02.1@93.464,98.044 ; R35.1 95.885,114.601 95.885,98.933 94.996,98.044 Q_L02.1@93.464,98.044
GND: "J3 connector.2" C3.1 C6.1 C12.1 C16.2 C19.2 C20.1 C21.1 C22.1 C23.1 C24.1 C25.1 C27.1 C30.1 C32.1 C101.1 C102.1 C103.1 D1.2 J1.1 J4.2 J4.3 J4.4 J5.3 J6.3 L3.1 R1.1 R3.1 R10.2 R19.1 R24.1 R27.1 R30.1 R32.1 R41.1 R43.1 R44.1 R45.1 U1.2 U2.2 U2.4 U4.4
"LM386 pin3": J5.2 U2.3 | length 24.6
  Top Layer w0.254: U2.3 122.682,81.28 125.349,78.613 129.518,78.613 129.667,78.464 129.667,78.446 J5.2
NetC1_1: C1.1 D1.1 R8.2 | length 30.7
  Top Layer w0.254: D1.1 96.774,58.674 106.593,68.493 C1.1
  Bottom Layer w0.254: C1.1 116.626,66.04 118.016,66.04 R8.2
NetC1_2: C1.2 C2.1 L3.2 | length 17.6
  Top Layer w0.254: L3.2 112.489,71.809 C1.2 116.586,71.08 116.586,67.564 114.959,65.937 114.618,65.937 C2.1
NetC2_2: C2.2 C4.2 Q1.2 R4.1 | length 70.8
  Top Layer w0.254: Q1.2 66.937,63.373 65.786,62.222 65.786,52.324 71.882,46.228 100.758,46.228 R4.1 103.886,47.879 112.268,56.261 C4.2 113.324,59.643 C2.2
NetC3_2: C3.2 C4.1 C5.1 Q1.3 R3.2 | length 82.6
  Top Layer w0.254: R3.2 66.415,65.024 66.796,64.643 Q1.3 ; C3.2 87.289,56.134 97.536,56.134 104.394,62.992 117.348,62.992 119.507,60.833 119.507,57.444 C4.1
  Bottom Layer w0.254: Q1.3 67.548,64.532 68.564,64.532 69.85,63.246 69.85,53.213 71.08,51.983 C5.1 81.193,51.983 82.296,53.086 C3.2
NetC6_2: C6.2 Q3.1 R18.2 R20.1 | length 61.4
  Top Layer w0.254: Q3.1 85.217,122.809 87.376,124.968 95.123,124.968 96.409,126.254 96.409,127.063 R18.2
  Bottom Layer w0.254: C6.2 56.642,108.204 69.245,120.807 69.245,122.585 Q3.1 ; R20.1 96.6,128.618 R18.2
NetC7_1: C7.1 C11.1 C12.2 Q3.3 R19.2 | length 47.7
  Top Layer w0.254: Q3.3 69.969,125.349 72.255,127.635 77.256,127.635 77.256,136.866 74.803,139.319 C12.2 ; C7.1 89.154,127.762 94.742,133.35 R19.2
  Bottom Layer w0.254: C11.1@77.256,127.635 79.669,130.048 84.495,130.048 C7.1
NetC8_1: C8.1 J1.2 | length 13.4
  Top Layer w0.8: J1.2 118.059,50.038 118.44,49.657 120.777,49.657 124.587,53.467 128.694,53.467 128.698,53.471 129.163,53.471 C8.1
NetC8_2: C8.2 C9.2 U2.5 | length 28.7
  Top Layer w0.8: C9.2 115.719,80.964 115.719,79.226 118.872,76.073 U2.5 120.142,67.945 C8.2@129.366,58.721
NetC9_1: C9.1 R1.2 | length 5.5
  Top Layer w0.254: C9.1 113.585,78.098 R1.2
NetC10_1: C10.1 J4.1 | length 7.2
  Top Layer w0.254: J4.1 J4.1@58.634,134.834
  Top Layer w0.8: J4.1@58.634,134.834 C10.1
NetC10_2: C10.2 C11.2 Q3.2 R18.1 | length 58
  Top Layer w0.254: 68.202,124.606 68.25,124.606 ; Q3.2@68.777,124.079 Q3.2 ; C11.2@82.256,127.635 82.256,132.04 86.614,136.398 97.456,136.398 R18.1
  Top Layer w0.8: C10.2 65.532,127.154 67.815,124.871 68.491,124.195 68.661,124.195 Q3.2@68.777,124.079 ; Q3.2 81.407,124.079 82.169,124.841 C11.2@82.169,127.548
NetC13_1: C13.1 R2.1 | length 6.7
  Top Layer w0.254: C13.1 132.628,94.321 R2.1
NetC13_2: C13.2 U2.1 | length 5.7
  Bottom Layer w0.254: C13.2 127.508,83.947 U2.1
NetC15_1: C15.1 R6.1 R7.2 | length 7.7
  Bottom Layer w0.254: R6.1 R7.2 122.301,98.378 C15.1
NetC15_2: C15.2 C28.2 U4.2 U4.6 | length 30.2
  Top Layer w0.254: C15.2 124.825,87.051 126.69,87.051 131.485,82.256 C28.2
  Bottom Layer w0.254: U4.2 114.841,91.44 U4.6 121.589,88.9 122.264,89.575 C15.2
NetC16_1: C16.1 R7.1 U4.3 | length 33
  Top Layer w0.254: C16.1 105.303,90.023 106.426,88.9 U4.3 117.061,96.52 128.571,96.52 R7.1
NetC17_1: C17.1 C31.2 R40.1 R41.2 | length 40.4
  Bottom Layer w0.254: R40.1 46.482,71.167 R41.2 51.816,74.208 C31.2 52.832,78.954 52.832,83.185 59.69,90.043 64.77,90.043 67.858,93.131 C17.1
NetC17_2: C17.2 Q_L01.2 Q_L04.2 R36.2 | length 34.9
  Top Layer w0.254: Q_L01.2 85.661,90.742 95.441,90.742 Q_L04.2
  Bottom Layer w0.254: R36.2 68.366,96.901 C17.2 75.547,92.18 83.095,92.18 84.415,90.86 85.543,90.86 Q_L01.2
NetC18_1: C18.1 C29.2 R26.1 R27.2 | length 20.1
  Top Layer w0.254: C18.1 48.394,82.463 R26.1 45.974,87.543 C29.2 48.643,89.956 49.365,90.678 56.122,90.678 56.583,90.217 R27.2
NetC18_2: C18.2 Q_RF1.2 R38.2 | length 43.4
  Top Layer w0.254: C18.2 50.165,87.207 50.434,86.938 50.434,86.853 51.562,85.725 63.373,85.725 67.945,81.153 75.993,81.153 R38.2 82.042,83.439 84.582,80.899 Q_RF1.2
NetC19_1: C19.1 U2.7 | length 8.1
  Bottom Layer w0.254: U2.7 126.522,74.773 130.8,74.773 C19.1
NetC20_2: C20.2 Q1.1 R4.2 R5.1 | length 45.1
  Top Layer w0.254: Q1.1 71.882,62.103 74.295,64.516 C20.2 74.676,61.682 74.676,50.441 74.825,50.292 86.741,50.292 R5.1 R4.2
NetC21_2: C21.2 R30.2 R31.1 R33.1 | length 57.9
  Top Layer w0.254: C21.2 62.355,87.209 62.086,87.478 62.001,87.478 60.579,88.9 60.579,104.902 64.135,108.458 71.327,108.458 R30.2 72.517,112.315 R31.1
  Bottom Layer w0.254: C21.2 62.43,87.39 61.708,87.39 61.595,87.503 61.341,87.503 59.817,85.979 59.817,80.217 R33.1
NetC22_2: C22.2 R29.1 R31.2 R38.1 R39.1 | length 46.9
  Top Layer w0.254: R38.1 R39.1 64.008,88.773 62.103,90.678 62.103,97.83 C22.2 75.859,101.894 77.343,103.378 R31.2 83.312,107.141 R29.1
NetC23_2: C23.2 R28.1 R29.2 R36.1 R37.1 | length 54.4
  Top Layer w0.254: R36.1 54.229,96.854 R37.1 ; C23.2 77.543,98.893 86.045,107.395 R28.1 88.011,112.696 R29.2
  Bottom Layer w0.254: R36.1 57.103,99.822 74.89,99.822 C23.2
NetC24_2: C24.2 Q_L02.2 Q_L03.2 R37.2 | length 50
  Top Layer w0.254: R37.2 65.626,94.615 69.977,94.615 72.771,97.409 82.431,97.409 84.336,99.314 Q_L03.2 ; Q_L02.2 93.464,99.314 94.361,100.211 94.361,101.473 94.742,101.854 97.917,101.854 100.33,104.267 100.33,108.077 103.545,111.292 C24.2
  Bottom Layer w0.254: Q_L03.2 Q_L02.2
NetC25_2: C25.2 Q_RF2.2 R39.2 | length 27.4
  Top Layer w0.254: R39.2 80.137,88.773 81.788,87.122 90.932,87.122 96.377,81.677 97.52,81.677 Q_RF2.2 C25.2
NetC28_1: C28.1 J5.1 | length 15.9
  Top Layer w0.254: C28.1 137.173,75.338 139.779,75.338 141.224,73.892 141.224,67.691 J5.1
NetC29_1: C29.1 J3.2 R24.2 | length 26.5
  Top Layer w0.254: C29.1 46.609,96.734 46.609,106.727 R24.2 48.895,113.665 J3.2
NetC31_1: C31.1 J2.2 R43.2 | length 40.2
  Top Layer w0.254: C31.1 60.198,76.073 66.261,70.01 R43.2 86.106,68.834 89.916,65.024
NetC100_2: C100.2 R6.2 R23.2 | length 18.7
  Top Layer w0.8: C100.2 108.706,97.824 108.706,99.228 R6.2 112.729,103.251 R23.2
NetC103_2: C103.2 D2.1 U1.1 | length 24.8
  Top Layer w1: U1.1 113.093,130.746 117.905,130.746 D2.1 121.398,134.239 127.684,134.239 129.228,135.783 129.228,139.308 C103.2
NetJ6_2: J6.2 R8.1 | length 14.6
  Top Layer w0.254: R8.1 129.413,63.627 137.795,55.245 J6.2
NetL1_1: L1.1 R20.2 | length 5.7
  Top Layer w0.8: L1.1 80.21,135.008 R20.2
NetL2_1: L2.1 R5.2 | length 4.2
  Top Layer w0.8: L2.1 R5.2
NetQ_L01_1: Q_L01.1 Q_L03.1 R34.1 | length 26.3
  Top Layer w0.254: Q_L01.1 85.098,89.535 83.566,91.067 83.566,97.282 84.328,98.044 Q_L03.1 86.995,98.044 87.884,98.933 87.884,104.013 89.281,105.41 92.329,105.41 93.091,106.172 R34.1
NetQ_L01_3: Q_L01.3 Q_L02.3 Q_RF1.1 | length 32.2
  Top Layer w0.254: Q_L01.3 87.757,92.075 89.281,93.599 89.281,99.695 90.17,100.584 Q_L02.3
  Bottom Layer w0.254: Q_L01.3 86.3,92.075 86.802,91.573 88.386,91.573 88.9,91.059 88.9,85.09 91.186,82.804 91.186,80.899 89.963,79.676 88.82,79.676 Q_RF1.1
NetQ_L03_3: Q_L03.3 Q_L04.3 Q_RF2.1 | length 33.1
  Top Layer w0.254: Q_L04.3 96.004,89.408 97.663,87.749 Q_RF2.1
  Bottom Layer w0.254: Q_L03.3 83.058,100.584 82.169,99.695 82.169,96.139 83.058,95.25 90.297,95.25 90.932,94.615 90.932,90.17 91.694,89.408 Q_L04.3
NetQ_RF1_3: Q_RF1.3 Q_RF2.3 Q_Tail.1 | length 17.6
  Top Layer w0.254: Q_RF1.3 93.472,82.169 95.25,80.391 97.536,80.391 Q_RF2.3 97.163,80.264 96.012,79.113 Q_Tail.1
NetQ_Tail_2: Q_Tail.2 R33.2 | length 24.6
  Top Layer w0.254: R33.2 92.202,77.343 94.742,74.803 Q_Tail.2
NetQ_Tail_3: Q_Tail.3 R32.2 | length 8.5
  Top Layer w0.254: R32.2 87.63,72.009 92.5,72.009 93.472,72.981 Q_Tail.3
NetR2_2: R2.2 U2.8 | length 12.4
  Bottom Layer w0.254: U2.8 127.762,80.518 132.668,85.424 R2.2
ref_out: C5.2 J2.3 R12.1 R44.2 | length 69.2
  Top Layer w0.254: C5.2 78.613,59.436 79.453,60.276 82.755,60.276 J2.3
  Bottom Layer w0.254: R44.2 72.644,53.975 75.819,57.15 78.446,57.15 C5.2 80.478,55.118 98.552,55.118 102.489,51.181 110.408,51.181 114.345,47.244 R12.1
search_out: C7.2 J3.3 R13.1 R45.2 | length 69.1
  Top Layer w0.254: J3.3 57.658,114.173 60.626,111.205 R45.2
  Bottom Layer w0.254: R45.2 66.628,111.205 67.437,112.014 67.437,116.713 70.485,119.761 99.615,119.761 R13.1 99.441,121.793 93.599,127.635 91.908,127.635 C7.2
pads on no net: U4.1 U4.5 U4.8

## Polygon pours and split planes (outlines as drawn)
GND on GND (split plane): 142.619,44.706 43.69,44.706 43.69,143.635 142.619,143.635
+9V on PWR (split plane): 142.619,44.706 43.69,44.706 43.69,143.635 142.619,143.635

## Text inside footprints (layer, text, board x,y; h text height)
J2: Top Overlay "3" at 86.995,68.326 h1.5; Top Overlay "2" at 90.551,68.326 h1.5; Top Overlay "1" at 94.361,68.58 h1.5
J3: Top Overlay "3" at 48.514,113.411 h1.5; Top Overlay "2" at 48.514,117.475 h1.5; Top Overlay "1" at 48.641,122.682 h1.5